# Altium PCB End-Device-v1.0.PcbDoc (part 4 of 4)
Units mil, origin at the board's own origin, x right, y up, seen from the top; angles counter-clockwise.
Board outline 1968.5 x 2440.08 mil, 4 copper layers (Top Layer, Ground, Power, Bottom Layer), stack 61.654 mil thick; 125 components, 76 nets, 388 pads, 715 vias.
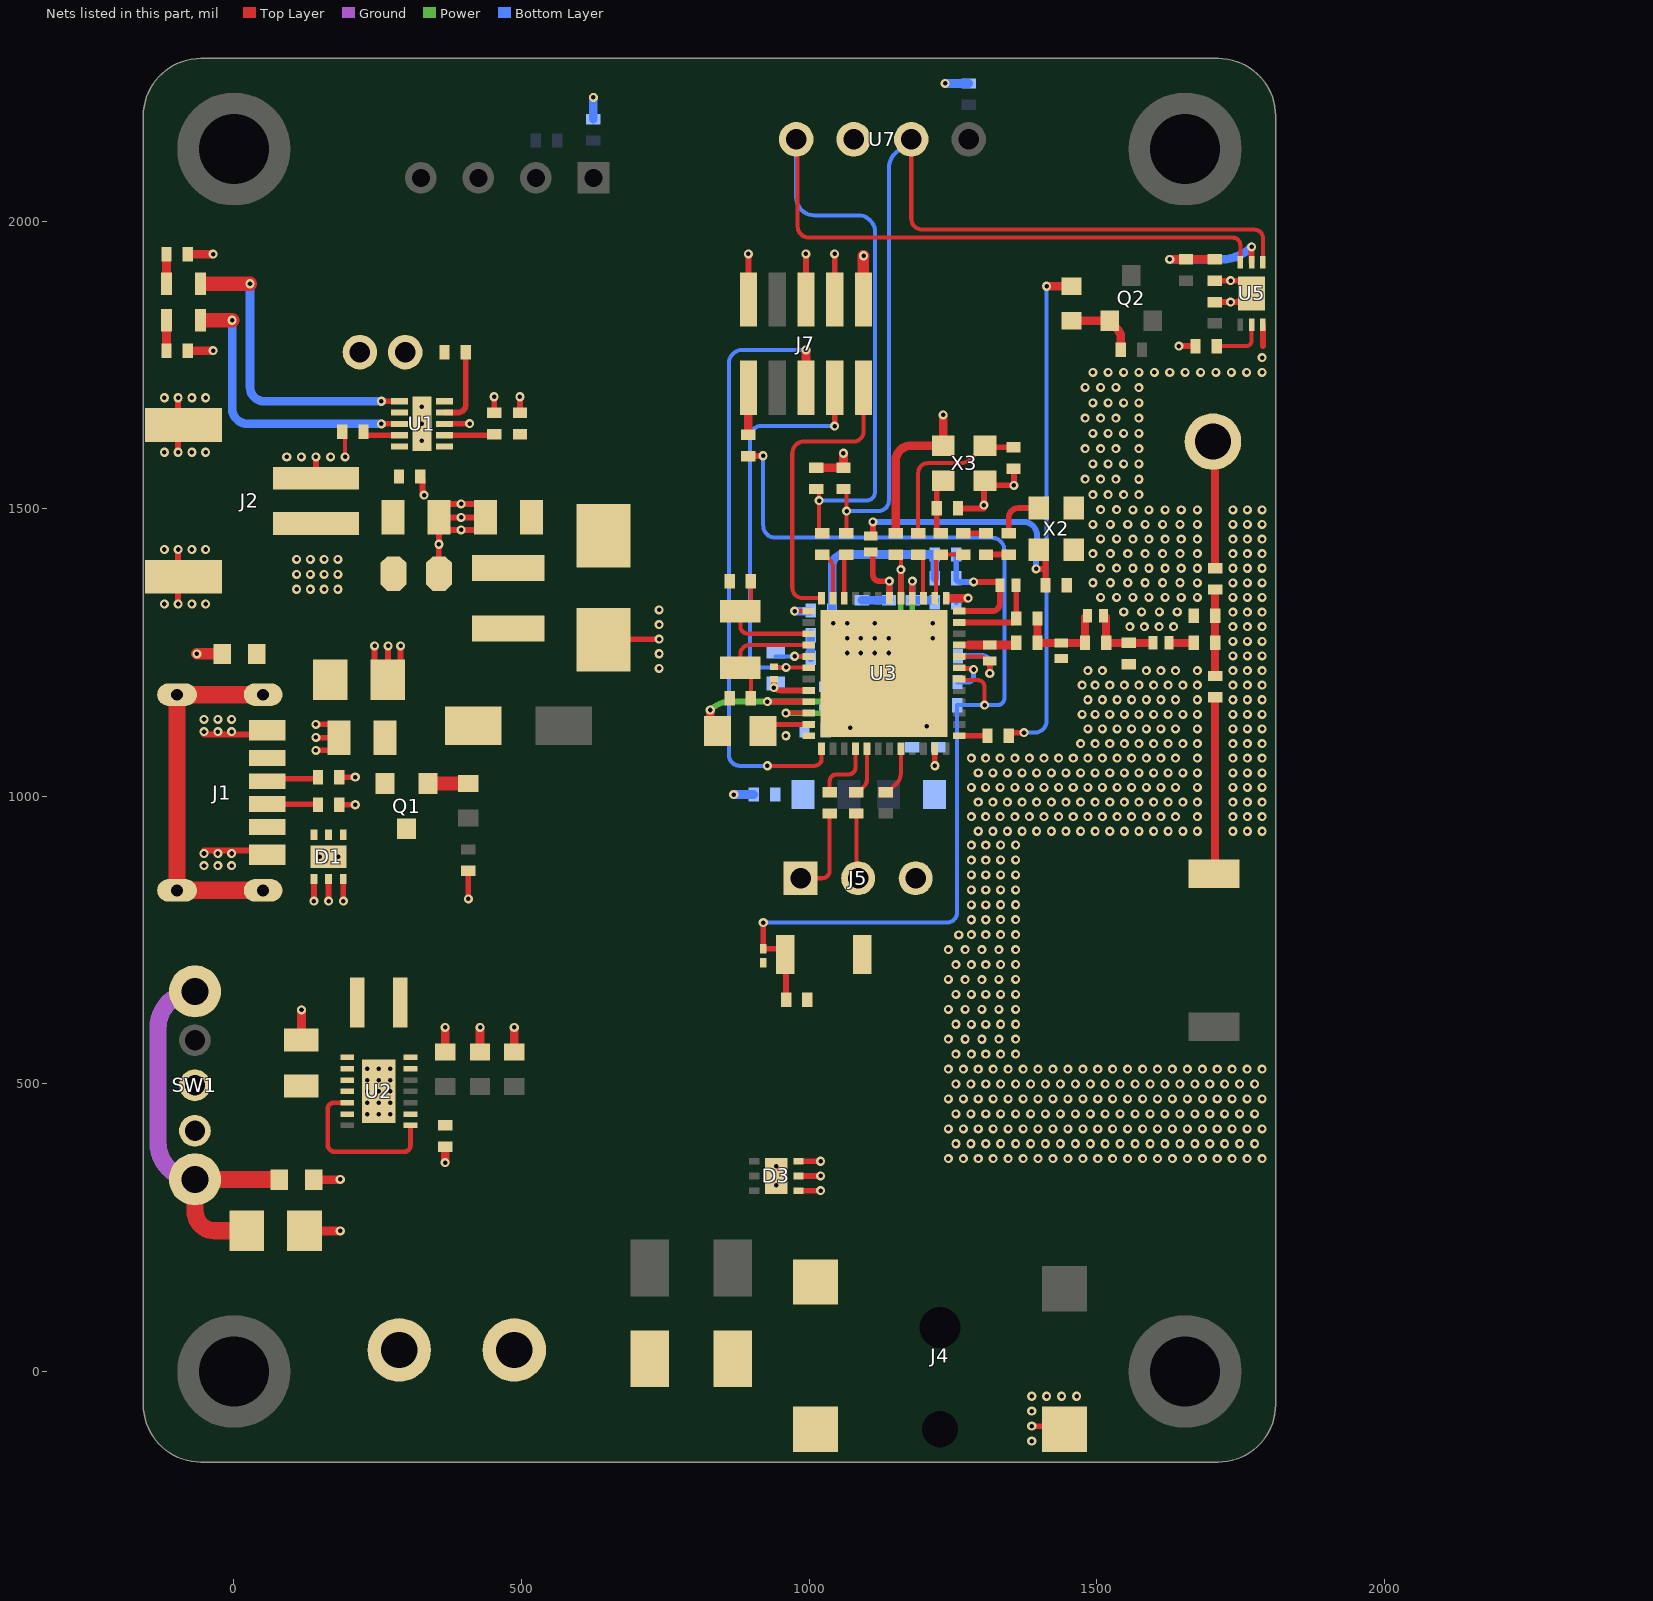
[diagram p4: the nets of this part, all layers, seen from the top]

## Via types
v1: diameter 15.75, hole 7.87, Top Layer to Bottom Layer, tented both sides, 712 vias
v2: diameter 15.75, hole 7.87, Top Layer to Bottom Layer, 3 vias

## Nets (pads, with @x,y where several pads share a name; then routed paths per layer and width w, separated by ;. In a path a pad name is that pad's centre, name@x,y a point inside that pad or via, vN(x,y) a via of type N, cw(c..) or ccw(c..) an arc to the next point about the centre after c; other vN are vias at no path point) (continued)
GND: C1.1 C2.1 C3.1 C4.1 C5.1 C6.1 C7.1 C8.1 C9.1 C10.1 C11.1 C12.1 C16.1 C17.1 C18.1 C19.1 C20.1 C21.1 C22.1 C23.1 C24.1 C25.1 C27.1 C28.1 C29.1 C30.1 C31.1 C35.1 C36.1 C37.1 C38.1 C40.1 C41.1 C42.1 C44.1 C45.1 C46.1 C47.1 C48.1 C49.1 C50.1 D1.1 D1.2 D1.3 D1.7 D2.1 D3.1 D3.2 D3.3 D3.7 D7.2 J1.A12 J1.B12 J2.1 J2.3 J2.4 J3.2 J4.2@1444.06,-100.43 J5.3 J7.3 J7.5 J7.9 NTC1.1 R1.2 R3.2 R6.1 R7.1 R8.1 R9.1 R11.1 R25.2 R41.1 SW4.2 TP1.2 U1.3 U1.11 U2.2 U2.13 U2.15 U3.48 U3.49 U5.3 U5.7 U7.3 X2.1 X2.2 X3.2 X3.4 | length 3809.9
  Top Layer w7: R7.1@188.37,1633.65 193.48,1628.54 v1(193.48,1590.09)
  Top Layer w10: v1(-97,1334.26) -97,1372.26 cw(c-87.63,1372.27) J2.3@-87.63,1381.63 cw(c-87.63,1391) -97,1391 v1(-97,1429) ; v1(-96.97,1598.05) -96.97,1636.05 cw(c-87.6,1636.05) J2.4@-87.63,1645.41 cw(c-87.6,1654.78) -96.97,1654.78 v1(-96.97,1692.78) ; v1@-51.93,905.54 50.59,905.54 cw(c50.59,898.26) J1.A12@57.87,898.26 ; v1@-51.93,1107.51 J1.B12@50.59,1107.51 ; v1(139.09,817.79) D1.1@139.09,856.4 ; v1@142.27,1125.01 C12.1@182.32,1125.01 ; v1@142.63,1079.81 C12.1@182.68,1079.81 ; v1@142.63,1101.65 C12.1@182.68,1101.65 ; J2.1@142.68,1565.07 v1(142.68,1590.09) ; v1(164.68,817.79) D1.2@164.68,856.4 ; R3.2@183.18,985.29 v1(211,985.29) ; R1.2@183.18,1033.21 v1(211,1033.21) ; v1(190.27,817.79) D1.3@190.27,856.4 ; C5.1@244.65,1221.35 v1(244.65,1261.3) v1@244.65,1261.41 ; C5.1@268,1221 v1@268,1261.05 ; C5.1@289.84,1221 v1@289.84,1261.05 ; C2.1@324.02,1555.99 327.91,1552.11 327.91,1528.01 330.8,1525.12 v1(330.8,1523.57) ; C1.1@356.17,1508.19 v1(395.12,1508.19) C3.1@435.06,1508.19 ; TP1.2@356.32,1384.21 TP1.2@356.32,1387.21 356.32,1434.12 356.52,1434.12 v1(356.52,1438.12) C1.1@356.52,1463 ; U1.3@366.07,1647.34 366.32,1647.59 409.38,1647.59 v1(409.63,1647.85) ; v1(407.52,821.79) R11.1@407.52,870.52 ; C3.1@435.42,1463 v1(395.12,1463) C1.1@356.52,1463 ; C3.1@435.42,1484.84 v1(395.12,1484.84) C1.1@356.52,1484.84 C1.1@356.52,1463 ; R8.1@452.41,1666.65 v1(452.41,1694.58) ; C4.1@497.32,1666.65 v1(497.32,1694.58) ; D2.1@642.52,1271.97 cw(c643.73,1271.97) 643.73,1273.17 v1(739.32,1273.17) ; J7.9@894.45,1863.72 v1(894.45,1943) ; D3.1@981.39,314.41 v1(1020,314.41) ; D3.2@981.39,340 v1(1020,340) ; D3.3@981.39,365.59 v1(1020,365.59) ; J7.5@994.45,1863.72 v1(994.45,1943) ; J7.3@1044.45,1863.72 v1(1044.45,1943) ; C44.1@1258.86,1500.38 1303.22,1500.38 ccw(c1303.22,1501.12) 1303.95,1501.12 v1(1303.95,1506.12) 1303.95,1546.79 cw(c1305.78,1546.79) X3.2@1305.78,1548.61 ccw(c1313.77,1548.61) 1313.77,1540.62 v1(1356.05,1540.62) 1356.05,1569.62 C45.1@1355.36,1569.62 ; v1(1387,-95) 1438.63,-95 cw(c1438.63,-100.43) J4.2@1444.06,-100.43 cw(c1444.06,-95.37) J4.2@1439,-95.37 ; v1(1642.66,1782.56) R41.1@1671.66,1782.56 ; C49.1@1705.16,1859.06 v1(1732.59,1859.06) 1754.02,1859.06 ccw(c1754.02,1874.2) U5.7@1769.16,1874.2 ccw(c1747.02,1874.2) 1747.02,1896.33 v1(1732.59,1896.33) C50.1@1705.16,1896.33 ; 1788.84,1782.56 U5.3@1788.84,1820.06
  Top Layer w15: C29.1@1150.48,1457.12 1150.48,1583.03 cw(c1177.09,1583.03) 1177.09,1609.63 X3.4@1232.94,1609.63 v1(1232.94,1662.93)
  Top Layer w15.33: C6.1@117.52,576.4 v1(117.52,628.78) ; C10.1@122.76,244.52 v1(184.91,244.52) ; R9.1@138.76,333.41 184.91,333.41 v1(184.91,334.02) ; v1(367.35,363) C11.1@367.35,390.89 ; C7.1@367.34,555.45 v1(367.34,598.12) ; C9.1@427.97,555.45 v1(427.97,598.12) ; C8.1@487.35,555.45 v1(487.35,598.12)
  Top Layer w20: v1(-64.37,1247.52) R6.1@-20.22,1247.52
  Bottom Layer w10: C25.1@1039.87,1241.15 1042.59,1243.87 1042.59,1277.45 C24.1@1039.87,1280.16 1042.09,1282.37 v1(1042.09,1301.05) v1@1040.99,1302.15 ; C23.1@1039.87,1322.89 C23.1@1040.99,1321.78 ; v1@1041.99,1302.15 C23.1@1041.99,1321.78 ; C42.1@1091.8,1301.05 v1(1114.09,1301.05) v1(1215.09,1301.05) ; 1191.09,1249.05 1215.95,1249.05 cw(c1215.95,1243.15) C46.1@1221.86,1243.15
  Bottom Layer w15: C47.1@625,2177 v2(625,2215) ; C27.1@903.91,1003.1 903.86,1003.05 v1@869.05,1003.05 ; C28.1@1029,1114.46 1029,1152.66 cw(c1029.96,1152.66) C16.1@1029.96,1153.61 C17.1@1071.03,1153.61 1071.09,1153.61 v1(1071.09,1119.05) ; C23.1@1039.87,1322.89 1039.87,1400.79 cw(c1059.37,1400.79) 1059.37,1420.29 C31.1@1218.54,1420.29 C30.1@1218.54,1379.07 ; C22.1@1179.26,1121.96 C18.1@1224.54,1121.96 ; v2(1236.51,2239.34) 1236.51,2239 C48.1@1277.5,2239 ; v1(869,1003) v1@869.05,1003.05
  other v1: 1387,-121 1387,-69 1387,-43 1413,-43 1439,-43 1465,-43 943,324.2 943,356.8 1242.07,370 1268.03,370 1294,370 1319.97,370 1345.93,370 1371.9,370 1397.86,370 1423.83,370 1449.8,370 1475.76,370 1501.73,370 1527.69,370 1553.66,370 1579.62,370 1605.59,370 1631.56,370 1657.52,370 1683.49,370 1709.45,370 1735.42,370 1761.39,370 1787.35,370 1255.05,395.97 1281.02,395.97 1306.98,395.97 1332.95,395.97 1358.91,395.97 1384.88,395.97 1410.85,395.97 1436.81,395.97 1462.78,395.97 1488.74,395.97 1514.71,395.97 1540.68,395.97 1566.64,395.97 1592.61,395.97 1618.57,395.97 1644.54,395.97 1670.51,395.97 1696.47,395.97 1722.44,395.97 1748.4,395.97 1774.37,395.97 1242.07,421.94 1268.03,421.94 1294,421.94 1319.97,421.94 1345.93,421.94 1371.9,421.94 1397.86,421.94 1423.83,421.94 1449.8,421.94 1475.76,421.94 1501.73,421.94 1527.69,421.94 1553.66,421.94 1579.62,421.94 1605.59,421.94 1631.56,421.94 1657.52,421.94 1683.49,421.94 1709.45,421.94 1735.42,421.94 1761.39,421.94 1787.35,421.94 1255.05,447.9 1281.02,447.9 1306.98,447.9 1332.95,447.9 1358.91,447.9 1384.88,447.9 1410.85,447.9 1436.81,447.9 1462.78,447.9 1488.74,447.9 1514.71,447.9 1540.68,447.9 1566.64,447.9 1592.61,447.9 1618.57,447.9 1644.54,447.9 1670.51,447.9 1696.47,447.9 1722.44,447.9 1748.4,447.9 1774.37,447.9 1242.07,473.87 1268.03,473.87 1294,473.87 1319.97,473.87 1345.93,473.87 1371.9,473.87 1397.86,473.87 1423.83,473.87 1449.8,473.87 1475.76,473.87 1501.73,473.87 1527.69,473.87 1553.66,473.87 1579.62,473.87 1605.59,473.87 1631.56,473.87 1657.52,473.87 1683.49,473.87 1709.45,473.87 1735.42,473.87 1761.39,473.87 1787.35,473.87 1255.05,499.83 1281.02,499.83 1306.98,499.83 1332.95,499.83 1358.91,499.83 1384.88,499.83 1410.85,499.83 1436.81,499.83 1462.78,499.83 1488.74,499.83 1514.71,499.83 1540.68,499.83 1566.64,499.83 1592.61,499.83 1618.57,499.83 1644.54,499.83 1670.51,499.83 1696.47,499.83 1722.44,499.83 1748.4,499.83 1774.37,499.83 1242.07,525.8 1268.03,525.8 1294,525.8 1319.97,525.8 1345.93,525.8 1371.9,525.8 1397.86,525.8 1423.83,525.8 1449.8,525.8 1475.76,525.8 1501.73,525.8 1527.69,525.8 1553.66,525.8 1579.62,525.8 1605.59,525.8 1631.56,525.8 1657.52,525.8 1683.49,525.8 1709.45,525.8 1735.42,525.8 1761.39,525.8 1787.35,525.8 1255.05,551.77 1282,551.64 1307.01,551.64 1332.92,551.77 1358.89,551.77 1242.07,577.73 1271.27,577.6 1300.48,577.6 1329.68,577.73 1358.89,577.73 1255.05,603.7 1282,603.57 1307.01,603.57 1332.92,603.7 1358.89,603.7 1242.07,629.66 1271.27,629.54 1300.48,629.54 1329.68,629.66 1358.89,629.66 1255.05,655.63 1282,655.5 1307.01,655.5 1332.92,655.63 1358.89,655.63 1271.27,681.47 1300.48,681.47 1242.07,681.6 1329.68,681.6 1358.89,681.6 1255.05,707.31 1282,707.43 1307.01,707.43 1332.92,707.56 1358.89,707.56 1271.27,733.4 1300.48,733.4 1242.07,733.53 1329.68,733.53 1358.89,733.53 1260.05,758.98 1282,759.36 1307.01,759.36 1332.92,759.49 1358.89,759.49 1282,785.33 1307.01,785.33 1332.92,785.46 1358.89,785.46 1282,811.3 1307.01,811.3 1332.92,811.42 1358.89,811.42 1282,837.26 1307.01,837.26 1332.92,837.39 1358.89,837.39 1282,863.23 1307.01,863.23 1332.92,863.36 1358.89,863.36 -51.93,879.54 -27.93,879.54 -3.93,879.54 1282,889.19 1307.01,889.19 1332.92,889.32 1358.89,889.32 148.88,894.79 181.47,894.79 -51.93,900.54 -27.93,900.54 -3.93,900.54 1282,915.16 1307.01,915.16 1332.92,915.29 1358.89,915.29 1294,939.2 1319.4,939.2 1344.8,939.2 1370.2,939.2 1395.6,939.2 1421,939.2 1446.4,939.2 1471.8,939.2 1497.2,939.2 1522.6,939.2 1548,939.2 1573.4,939.2 1598.8,939.2 1624.2,939.2 1649.6,939.2 1675,939.2 1736.55,939.2 1761.95,939.2 1787.35,939.2 1282,964.6 1306.7,964.6 1332.1,964.6 1357.5,964.6 1382.9,964.6 1408.3,964.6 1433.7,964.6 1459.1,964.6 1484.5,964.6 1509.9,964.6 1535.3,964.6 1560.7,964.6 1586.1,964.6 1611.5,964.6 1636.9,964.6 1675,964.6 1736.55,964.6 1761.95,964.6 1787.35,964.6 1294,990 1319.4,990 1344.8,990 1370.2,990 1395.6,990 1421,990 1446.4,990 1471.8,990 1497.2,990 1522.6,990 1548,990 1573.4,990 1598.8,990 1624.2,990 1649.6,990 1675,990 1736.55,990 1761.95,990 1787.35,990 1282,1015.4 1306.7,1015.4 1332.1,1015.4 1357.5,1015.4 1382.9,1015.4 1408.3,1015.4 1433.7,1015.4 1459.1,1015.4 1484.5,1015.4 1509.9,1015.4 1535.3,1015.4 1560.7,1015.4 1586.1,1015.4 1611.5,1015.4 1636.9,1015.4 1675,1015.4 1736.55,1015.4 1761.95,1015.4 1787.35,1015.4 1294,1040.8 1319.4,1040.8 1344.8,1040.8 1370.2,1040.8 1395.6,1040.8 1421,1040.8 1446.4,1040.8 1471.8,1040.8 1497.2,1040.8 1522.6,1040.8 1548,1040.8 1573.4,1040.8 1598.8,1040.8 1624.2,1040.8 1649.6,1040.8 1675,1040.8 1736.55,1040.8 1761.95,1040.8 1787.35,1040.8 1282,1066.2 1306.7,1066.2 1332.1,1066.2 1357.5,1066.2 1382.9,1066.2 1408.3,1066.2 1433.7,1066.2 1459.1,1066.2 1484.5,1066.2 1509.9,1066.2 1535.3,1066.2 1560.7,1066.2 1586.1,1066.2 1611.5,1066.2 1636.9,1066.2 1675,1066.2 1736.55,1066.2 1761.95,1066.2 1787.35,1066.2 142.37,1079.81 1471.8,1091.6 1497.2,1091.6 1522.6,1091.6 1548,1091.6 1573.4,1091.6 1598.8,1091.6 1624.2,1091.6 1649.6,1091.6 1675,1091.6 1736.55,1091.6 1761.95,1091.6 1787.35,1091.6 142.37,1102.41 959.7,1105.26 -51.93,1112.51 -27.93,1112.51 -3.93,1112.51 1484.5,1117 1509.9,1117 1535.3,1117 1560.7,1117 1586.1,1117 1611.5,1117 1636.9,1117 1675,1117 1736.55,1117 1761.95,1117 1787.35,1117 1204.72,1122.01 142.37,1125.01 -51.93,1133.51 -27.93,1133.51 -3.93,1133.51 1474.53,1142.4 1497.2,1142.4 1522.6,1142.4 1548,1142.4 1573.4,1142.4 1598.8,1142.4 1624.2,1142.4 1649.6,1142.4 1675,1142.4 1736.55,1142.4 1761.95,1142.4 1787.35,1142.4 1484.5,1167.8 1509.9,1167.8 1535.3,1167.8 1560.7,1167.8 1586.1,1167.8 1611.5,1167.8 1636.9,1167.8 1675,1167.8 1736.55,1167.8 1761.95,1167.8 1787.35,1167.8 1474.53,1193.2 1497.2,1193.2 1522.6,1193.2 1548,1193.2 1573.4,1193.2 1598.8,1193.2 1624.2,1193.2 1649.6,1193.2 1675,1193.2 1736.55,1193.2 1761.95,1193.2 1787.35,1193.2 1484.5,1218.6 1509.9,1218.6 1586.1,1218.6 1611.5,1218.6 1636.9,1218.6 1675,1218.6 1736.55,1218.6 1761.95,1218.6 1787.35,1218.6 739.32,1222.37 1736.55,1244 1761.95,1244 1787.35,1244 739.32,1247.77 1066.09,1249.05 1090.09,1249.05 1114.09,1249.05 1138.09,1249.05 268,1261.3 289.84,1261.3 1736.55,1269.4 1761.95,1269.4 1787.35,1269.4 1066.09,1275.05 1090.09,1275.05 1114.09,1275.05 1138.09,1275.05 1215.09,1275.05 1557.56,1294.8 1582.96,1294.8 1608.36,1294.8 1633.76,1294.8 1736.55,1294.8 1761.95,1294.8 1787.35,1294.8 739.32,1298.57 1066.09,1301.05 1546.88,1320.38 1577.88,1320.38 1608.88,1320.38 1639.88,1320.38 1736.55,1320.2 1761.95,1320.2 1787.35,1320.2 739.32,1323.97 -121,1334.26 -73,1334.26 -49,1334.26 1506.54,1345.78 1534.62,1345.78 1562.69,1345.6 1590.77,1345.6 1618.85,1345.6 1646.92,1345.6 1675,1345.6 1736.55,1345.6 1761.95,1345.6 1787.35,1345.6 1493.4,1371.18 1523.66,1371.18 1553.93,1371.18 1584.2,1371.18 1614.47,1371.18 1644.73,1371.18 1675,1371 1736.55,1371 1761.95,1371 1787.35,1371 1562.69,1396.4 1590.77,1396.4 1618.85,1396.4 1646.92,1396.4 1675,1396.4 1736.55,1396.4 1761.95,1396.4 1787.35,1396.4 1506.54,1396.58 1534.62,1396.58 1493.4,1421.98 1523.66,1421.98 1553.93,1421.98 1584.2,1421.98 1614.47,1421.98 1644.73,1421.98 1675,1421.8 1736.55,1421.8 1761.95,1421.8 1787.35,1421.8 -121,1429 -73,1429 -49,1429 1506.54,1447.38 1534.62,1447.38 1562.69,1447.2 1590.77,1447.2 1618.85,1447.2 1646.92,1447.2 1675,1447.2 1736.55,1447.2 1761.95,1447.2 1787.35,1447.2 1493.4,1472.78 1523.66,1472.78 1553.93,1472.78 1584.2,1472.78 1614.47,1472.78 1644.73,1472.78 1675,1472.6 1736.55,1472.6 1761.95,1472.6 1787.35,1472.6 1506.54,1498.18 1534.62,1498.18 1562.69,1498 1590.77,1498 1618.85,1498 1646.92,1498 1675,1498 1736.55,1498 1761.95,1498 1787.35,1498 1493.17,1524.56 1519.91,1524.56 1546.66,1524.56 1573.4,1524.56 1479.8,1551.3 1506.54,1551.3 1533.28,1551.3 1573.4,1551.12 1493.17,1577.68 1519.91,1577.68 1546.66,1577.68 1573.4,1577.68 91.88,1590.09 117.28,1590.09 168.08,1590.09 -120.97,1598.05 -72.97,1598.05 -48.97,1598.05 1479.8,1604.43 1506.54,1604.43 1533.28,1604.43 1573.4,1604.24 326.89,1617.65 1493.17,1630.8 1519.91,1630.8 1546.66,1630.8 1573.4,1630.8 326.89,1647.34 1573.4,1657.36 1479.8,1657.55 1506.54,1657.55 1533.28,1657.55 326.89,1677.02 1493.17,1683.92 1519.91,1683.92 1546.66,1683.92 1573.4,1683.92 -120.97,1692.78 -72.97,1692.78 -48.97,1692.78 1479.8,1710.67 1506.54,1710.67 1533.28,1710.67 1573.4,1710.48 1493.17,1737.05 1519.91,1737.05 1546.66,1737.05 1573.4,1737.05 1600.14,1737.05 1626.89,1737.05 1653.63,1737.05 1680.38,1737.05 1707.12,1737.05 1733.86,1737.05 1760.61,1737.05 1787.35,1737.05 1787.35,1762.56
I2C2_SCL: R19.1 R33.1 U5.6 U7.4 | length 1881.8
  Top Layer w7: U7.4@977.5,2142 cw(c977.5,2139.5) 980,2139.5 980,1990.81 ccw(c999.37,1990.81) 999.37,1971.44 1191.03,1971 1738,1971 cw(c1738,1964) 1739.7,1970.79 cw(c1736.52,1958.23) 1749.47,1958.23 U5.6@1749.47,1928.33 ; R33.1@1017.2,1535.68 1017.2,1462.6 ccw(c1022.69,1462.6) R19.1@1022.69,1457.12
  Bottom Layer w7: U7.4@977.5,2142 977.5,2041.61 ccw(c1009.11,2041.61) 1009.11,2010 1085,2010 cw(c1085,1980.31) 1114.69,1980.31 1114.69,1529.32 cw(c1099.37,1529.32) 1099.37,1514 v1(1017.31,1514)
I2C2_SDA: R18.1 R32.1 U5.4 U7.2 | length 1621.8
  Top Layer w7: R32.1@1059.67,1534.12 1065,1528.79 v1(1065,1495.63) 1065,1457.45 R18.1@1064.67,1457.12 ; U7.2@1177.5,2142 1177.5,2004.33 ccw(c1196.83,2004.33) 1196.83,1985 1774.08,1985 cw(c1774.08,1970.24) 1788.84,1970.24 U5.4@1788.84,1928.33
  Bottom Layer w7: v1@1065,1496 1120.67,1496 ccw(c1120.67,1513.77) 1138.44,1513.77 1138.44,2090.55 cw(c1177.5,2090.55) 1173.75,2129.43 1177.5,2133.17 U7.2@1177.5,2142
NetANT1_1: ANT1.1 R30.2 | length 308.3
  Top Layer w10: ANT1.1@1703.92,865.54 ANT1.1@1705.71,865.54
  Top Layer w13.98: ANT1.1@1705.71,865.54 R30.2@1705.71,1172.02
NetANT2_1: ANT2.1 R35.2 | length 223.7
  Top Layer w13.98: ANT2.1@1701.96,1616.52 1705.71,1616.52 R35.2@1705.71,1396.52
NetC3_2: C3.2 C4.2 D2.2 F1.2 U1.1
NetC5_2: C5.2 J1.MH1 J1.MH2 J1.MH3 J1.MH4 R6.2 | length 639.4
  Top Layer w30: J1.MH1@50.78,836.44 J1.MH2@-98.82,836.44 J1.MH3@-98.82,1176.6 J1.MH4@50.78,1176.6
NetC10_2: C10.2 R9.2 SW1.4 SW1.5 | length 712.5
  Top Layer w30: C10.2@22.76,244.52 -32.69,244.52 cw(c-32.69,279.52) -67.69,279.52 SW1.5@-67.69,334.02 77.15,334.02 cw(c77.15,332.41) R9.2@78.76,332.41
  Ground w30: SW1.5@-67.69,334.02 cw(c-67.69,398.33) -132,398.33 -132,596.48 cw(c-67.69,596.48) SW1.4@-67.69,660.79
NetC11_2: C11.2 U2.1 U2.12 | length 293.8
  Top Layer w8: U2.12@196.72,467.26 173.95,467.26 ccw(c173.95,456.31) 163,456.31 163,395.08 ccw(c176.2,395.08) 176.2,381.89 295.65,381.89 ccw(c295.65,393.19) 306.96,393.19 U2.1@306.96,427.89
NetC19_2: C19.2 U3.39 X1.2 | length 214.5
  Top Layer w7: C19.2@898.8,1373.62 898.8,1340.39 cw(c880.3,1340.39) X1.2@880.3,1321.89 880.3,1296.3 ccw(c894.08,1296.3) 894.08,1282.52 U3.39@999.05,1282.52
NetC20_2: C20.2 U3.40 X1.1 | length 215.1
  Top Layer w7: C20.2@898.8,1170.31 898.8,1204.96 ccw(c880.3,1204.96) X1.1@880.3,1223.46 880.3,1247.09 cw(c896.05,1247.09) 896.05,1262.83 U3.40@999.05,1262.83
NetC24_2: C24.2 C25.2 FB1.2 U3.41 | length 126.6
  Top Layer w7: v1(974.7,1243.44) 974.7,1243.15 U3.41@999.05,1243.15
  Bottom Layer w7: FB1.2@941.95,1243.18 C25.2@1002.87,1243.18
  Bottom Layer w15: C25.2@1002.87,1241.15 C24.2@1002.87,1282.16
NetC30_2: C30.2 C31.2 L3.2 U3.24 | length 230.9
  Top Layer w10: U3.24@1260.86,1321.89 1318.14,1321.89 ccw(c1318.14,1335.49) 1331.74,1335.49 L3.2@1331.74,1366.7 ; v1(1286,1372.7) L3.2@1331.74,1372.7
  Bottom Layer w10: C31.2@1255.54,1420.29 C30.2@1255.54,1379.07 ccw(c1261.91,1379.07) 1261.91,1372.7 v1(1286,1372.7)
NetC32_1: C32.1 C33.2 C36.2 C39.2 L4.1 | length 174.8
  Top Layer w13.98: C33.2@1397,1309.11 C39.2@1397,1266.77 C36.2@1438.55,1266.77 C32.1@1479.47,1266.77 1479.47,1309.38 cw(c1484.2,1309.38) L4.1@1484.2,1314.11
NetC32_2: C32.2 C37.2 L4.2 L5.1 | length 131.2
  Top Layer w13.98: L4.2@1511.75,1314.11 cw(c1511.75,1309.4) 1516.47,1309.4 C32.2@1516.47,1266.77 C37.2@1555.52,1266.77 L5.1@1597.67,1266.77
NetC33_1: C33.1 L3.1 U3.23 | length 160.6
  Top Layer w10: U3.23@1260.86,1302.2 1356,1302.2 1360,1306.2 L3.1@1360,1366.01
NetC34_1: C34.1 L5.2 | length 41.5
  Top Layer w13.98: L5.2@1625.23,1266.77 C34.1@1666.71,1266.77
NetC34_2: C34.2 C38.2 R30.1 R35.1 | length 150.5
  Top Layer w13.98: R30.1@1705.71,1209.02 C34.2@1705.71,1266.77 C38.2@1705.71,1314.11 R35.1@1705.71,1359.52
NetC35_2: C35.2 FB2.1 X2.4 | length 466.5
  Top Layer w10: FB2.1@1110.8,1452.39 1111,1452.6 v1(1111,1477) ; v1(1394.44,1395.27) 1410.97,1395.27 ; X2.4@1398.95,1428.29 cw(c1398.95,1416.28) 1410.97,1416.28 1410.97,1395.27 ; C35.2@1410.97,1366.7 1410.97,1395.27
  Bottom Layer w10: v1(1111,1477) 1372.57,1477 cw(c1372.57,1453.37) 1396.17,1452.27 1396.15,1451.81 v1(1394.44,1395.27)
NetC39_1: C39.1 L6.2 U3.21 | length 85.5
  Top Layer w15: 1277.37,1263.01 1358.5,1263.01 1360,1264.51 C39.1@1360,1266.77
NetC43_1: C43.1 R36.2 | length 43
  Top Layer w10: C43.1@1303.95,1420.12 R36.2@1346.91,1420.12
NetC43_2: C43.2 R37.1 | length 43.1
  Top Layer w10: R37.1@1260.86,1457.12 C43.2@1303.95,1457.12
NetC44_2: C44.2 R38.1 X3.1 | length 92.4
  Top Layer w10: X3.1@1221.86,1548.61 C44.2@1221.86,1500.38 1221.86,1458.8 ccw(c1223.54,1458.8) R38.1@1223.54,1457.12
NetC45_2: C45.2 R39.1 X3.3 | length 292.5
  Top Layer w7: R39.1@1189.59,1457.11 1189.59,1562.12 cw(c1206.59,1562.12) 1206.59,1579.12 1261.8,1579.12 ccw(c1261.8,1609.63) 1285.41,1590.31 1289.59,1595.42 X3.3@1305.78,1609.63
  Top Layer w10: X3.3@1305.78,1609.63 ccw(c1313.05,1616.9) 1313.05,1606.62 C45.2@1355.36,1606.62
NetC46_2: C46.2 L6.1 U3.20 | length 157.3
  Top Layer w7: U3.20@1260.86,1243.15 1294.78,1243.15 cw(c1294.78,1216.27) L6.1@1313.79,1235.28 ; v1@1313.79,1213.75 v1(1313.99,1213.55)
  Top Layer w10: v1@1313.79,1213.75 L6.1@1313.79,1235.28
  Bottom Layer w7: C46.2@1258.86,1243.15 cw(c1259.83,1243.15) C46.2@1259.83,1244.12
  Bottom Layer w10: C46.2@1259.83,1244.12 1300.32,1244.12 cw(c1300.32,1230.65) 1313.79,1230.65 1313.79,1213.55 v1(1313.99,1213.55)
NetC50_2: C50.2 R40.1 U5.5 | length 253
  Top Layer w10: U5.5@1769.16,1928.33 v1(1769.16,1955)
  Top Layer w15: v1(1626.89,1933.33) R40.1@1655.16,1933.33 C50.2@1705.16,1933.33
  Bottom Layer w15: v1(1626.89,1933.33) 1716.84,1933.33 ccw(c1716.84,2007.32) v1(1769.16,1955)
NetD4_2: D4.2 J3.1
NetD5_2: D5.2 J4.1
NetJ1_A5: J1.A5 R1.1 | length 91.2
  Top Layer w10: J1.A5@57.87,1026.21 62.29,1030.62 143.59,1030.62 R1.1@146.18,1033.21
NetJ1_B5: J1.B5 R3.1 | length 88
  Top Layer w10: J1.B5@58.53,986.18 145.29,986.18 R3.1@146.18,985.29
NetL1_1: L1.1 U2.8 U2.9
NetL1_2: L1.2 U2.6 U2.7
NetL2_2: L2.2 U3.47 | length 84.2
  Top Layer w9: L2.2@930.92,1124.66 U3.47@998.67,1124.66
  Top Layer w10: L2.2@919.67,1113.41 L2.2@930.92,1124.66 ; U3.47@998.67,1124.66 U3.47@999.05,1125.04
NetLED1_1: LED1.1 R2.1 | length 52.9
  Top Layer w15: R2.1@-117.16,1774.63 LED1.1@-117.16,1827.52
NetLED1_2: LED1.2 U1.8 | length 510.5
  Top Layer w10: v1(256.52,1647.53) 278.15,1647.53 U1.8@287.72,1647.34
  Top Layer w25: LED1.2@-54.28,1827.52 v1(-3,1827.52)
  Bottom Layer w15: v1(-3,1827.52) -3,1674.29 ccw(c23.77,1674.29) 23.77,1647.53 v1(256.52,1647.53)
NetLED2_1: LED2.1 R4.1 | length 51.8
  Top Layer w15: LED2.1@-117.16,1890.76 R4.1@-117.16,1942.52
NetNTC1_2: NTC1.2 R5.1 U1.5
NetQ1_1: Q1.1 R10.2 | length 70
  Top Layer w25: Q1.1@337.48,1022.2 R10.2@407.52,1022.2
NetQ2_1: Q2.1 R43.2 R44.2 | length 123.8
  Top Layer w15: R44.2@1456.16,1826.68 Q2.1@1522.76,1826.68 1535.4,1812.39 cw(c1522.76,1798.34) 1541.66,1798.34 R43.2@1541.66,1776.09
NetR5_2: R5.2 U1.4 | length 136
  Top Layer w10: U1.4@366.07,1667.02 389.18,1667.02 ccw(c389.18,1680.91) 403.07,1680.91 R5.2@403.07,1772.02
NetR7_2: R7.2 U1.9 | length 65.8
  Top Layer w10: R7.2@225.37,1633.65 ccw(c231.37,1633.65) 231.37,1627.65 U1.9@287.72,1627.65
NetR8_2: R8.2 U1.2 | length 88.6
  Top Layer w10: U1.2@366.07,1627.65 448.41,1627.65 ccw(c448.41,1631.65) R8.2@452.41,1631.65
NetR12_2: R12.2 U3.8 | length 86.8
  Top Layer w7: R12.2@1133.15,1007.12 1142.15,1012.62 1151.35,1021.43 ccw(c1133.15,1040.46) 1159.48,1040.46 U3.8@1159.48,1082.72
NetR15_2: R15.2 U3.13 | length 49.2
  Top Layer w10: U3.13@1260.86,1105.35 R15.2@1310.02,1105.35
NetR16_1: R16.1 U3.4 | length 110.5
  Top Layer w7: R16.1@1035.74,1007.12 1035.74,1026.75 cw(c1046.81,1026.75) 1046.81,1037.81 1068.37,1037.81 ccw(c1068.37,1050.19) 1080.74,1050.19 U3.4@1080.74,1082.72
NetR17_1: R17.1 U3.5 | length 83.9
  Top Layer w7: R17.1@1081.94,1007.12 1090.94,1012.62 1094.02,1015.28 ccw(c1081.94,1029.27) 1100.43,1029.27 U3.5@1100.43,1082.72
NetR18_2: R18.2 U3.34 | length 77.7
  Top Layer w7: U3.34@1061.06,1344.53 1061.06,1416.51 cw(c1064.67,1416.51) R18.2@1064.67,1420.12
NetR19_2: R19.2 U3.35 | length 84.2
  Top Layer w7: R19.2@1022.69,1420.12 1031.69,1414.62 1033.27,1413.53 cw(c1022.69,1398.13) 1041.37,1398.13 U3.35@1041.37,1344.53
NetR24_1: R24.1 U3.19 | length 71.1
  Top Layer w9: U3.19@1260.86,1223.46 1261.95,1222.37 v1@1286,1222.37
  Bottom Layer w9: R24.1@1257.86,1198.57 1275.74,1198.57 ccw(c1275.74,1208.83) 1286,1208.83 v1(1286,1220.37)
NetR24_2: R24.2 R25.1 | length 38.5
  Bottom Layer w10: R25.1@1182.36,1198.57 R24.2@1220.86,1198.57
NetR36_1: R36.1 X2.3 | length 88.7
  Top Layer w10: R36.1@1346.91,1457.12 1346.91,1484.02 cw(c1364.01,1484.02) 1351.92,1496.11 cw(c1364.01,1484.02) 1364.01,1501.12 X2.3@1398.95,1501.12
NetR37_2: R37.2 R38.2 U3.26 | length 120.6
  Top Layer w7: U3.26@1218.54,1344.53 1220.4,1346.4 1220.4,1414.62 1225.9,1420.12 R38.2@1228.54,1420.12 R37.2@1267.86,1420.12
NetR39_2: R39.2 U3.27 | length 81.1
  Top Layer w7: R39.2@1189.59,1420.11 1192.41,1420.11 1197.91,1414.61 1197.91,1345.47 U3.27@1198.85,1344.53
NetR41_2: R41.2 U5.2 | length 93.8
  Top Layer w7: R41.2@1708.66,1782.56 1759.43,1782.56 ccw(c1759.43,1792.29) 1769.16,1792.29 U5.2@1769.16,1820.06
NRST: C21.2 D7.1 R29.2 R45.1 SW4.1 U3.18 | length 1896.6
  Top Layer w7: U3.18@1260.86,1203.78 U3.18@1260.94,1203.86 ; U3.18@1260.94,1201.86 1293.42,1201.86 cw(c1293.42,1190.36) 1304.92,1190.36 v1(1304.92,1158.5)
  Top Layer w10: R29.2@894.45,1591.4 920,1591.4 v1(920,1592) ; v1(920.28,780.44) D7.1@920.28,734.98 948.35,734.98 cw(c948.35,724.98) SW4.1@958.35,724.98 cw(c958.35,723.33) 960,723.33 C21.2@960,646
  Bottom Layer w7: v1(920,1592) 920,1471.14 ccw(c941.51,1471.14) 941.51,1449.62 1317.38,1449.62 cw(c1317.38,1427.57) 1339.44,1427.57 1339.44,1170.63 cw(c1327.31,1170.63) 1327.31,1158.5 1313.99,1158.5 R45.1@1257.19,1158.5 1257.19,797.85 cw(c1239.78,797.85) 1239.78,780.44 v1(920.28,780.44)
PB0-VDD_TCXO: C41.2 C42.2 FB2.2 U3.30 | length 185.5
  Top Layer w10: FB2.2@1110.8,1424.83 1110.8,1385.2 ccw(c1122,1385.2) 1122,1374 v1(1139.61,1374) 1139.61,1344.53 U3.30@1139.8,1344.53
  Bottom Layer w10: C41.2@1138.8,1340.53 1139.8,1341.53 1139.8,1373.81 v1(1139.61,1374)
  Bottom Layer w15: C42.2@1091.8,1340.53 C41.2@1138.8,1340.53
PG: LED2.2 U1.6 U1.7 | length 537
  Top Layer w10: v1(256.52,1686.71) U1.6@287.72,1686.71
  Top Layer w25: LED2.2@-55.45,1890.76 27.76,1890.76 v1(28,1891)
  Bottom Layer w15: v1(28,1891) 28,1711.36 ccw(c52.65,1711.36) 52.65,1686.71 v1(256.52,1686.71)
PWR_SW: R15.1 R44.1 | length 876.2
  Top Layer w10: R15.1@1347.02,1110.35 v1@1373.54,1110.35
  Top Layer w15: v1(1412.82,1886.67) R44.1@1456.16,1886.68
  Bottom Layer w7: v1@1373.54,1111 1392.86,1111 ccw(c1392.86,1130.96) 1412.82,1130.96 v1(1412.82,1886.67)
  other v1: 1373.54,1110.55
RST: J7.10 R29.1 | length 81.8
  Top Layer w15: R29.1@894.45,1628.4 J7.10@894.45,1710.18
SWDCLK: J7.4 R31.1 U3.42 | length 742.3
  Top Layer w7: R31.1@939,1223.64 U3.42@998.87,1223.64
  Top Layer w10: v1(1044.45,1643.62) J7.4@1044.45,1710.18
  Bottom Layer w7: v1(959.95,1223.9) 910.84,1223.9 cw(c910.84,1237.87) 896.87,1237.87 896.87,1623.66 cw(c916.82,1623.66) 916.82,1643.62 v1(1044.45,1643.62)
SWDIO: J7.2 U3.36 | length 516.6
  Top Layer w7: U3.36@1021.69,1344.53 988.96,1344.53 cw(c988.96,1362.84) 970.65,1362.84 970.65,1596.06 cw(c991.46,1596.06) 991.46,1616.86 1077.96,1616.86 ccw(c1077.96,1633.36) 1094.45,1633.36 J7.2@1094.45,1710.18
SWO: J7.6 U3.1 | length 1090
  Top Layer w7: v1(927.41,1053.04) 1009.43,1053.04 ccw(c1009.43,1065.3) 1021.69,1065.3 U3.1@1021.69,1082.72
  Top Layer w15: J7.6@994.45,1710.18 v1(994.45,1776)
  Bottom Layer w7: v1(927.41,1053.04) 879.22,1053.04 cw(c879.22,1071.53) 860.74,1071.53 860.74,1752.8 cw(c883.93,1752.8) 883.93,1776 v1(994.45,1776)
UART_RX: J5.2 R17.2 | length 114.5
  Top Layer w7: R17.2@1081.94,970.12 1081.94,860.78 ccw(c1085.2,860.78) J5.2@1085.2,857.52
UART_TX: J5.1 R16.2 | length 157.4
  Top Layer w7: J5.1@985.2,857.52 1022.26,857.52 ccw(c1022.26,871.01) 1035.74,871.01 R16.2@1035.74,970.12
VBAT: C1.2 C2.2 J2.2 R2.2 R4.2 SW1.3 TP1.1 U1.10 | length 88.3
  Top Layer w15: R2.2@-80.16,1774.63 v1(-36,1774.63) ; R4.2@-80.16,1942.52 v1(-36,1942.52)
  other v1: 108.96,1359.85 132.96,1359.85 156.96,1359.85 180.96,1359.85 108.96,1385.85 132.96,1385.85 156.96,1385.85 180.96,1385.85 108.96,1411.85 132.96,1411.85 156.96,1411.85 180.96,1411.85
VBUS: C12.2 D6.1 F1.1 Q1.2
VDD: C16.2 C17.2 C18.2 C22.2 C23.2 FB1.1 J7.1 R27.2 R31.2 R32.2 R33.2 R45.2 U3.11 U3.37 U3.44 | length 307.2
  Top Layer w7: v1(974.7,1321.89) U3.37@999.05,1321.89
  Top Layer w10: R31.2@939,1203.49 938.73,1203.22 v1(938.73,1189.08) ccw(c950.75,1201.1) 950.75,1184.09 U3.44@999.05,1184.09 ; v1(1218.54,1053.04) U3.11@1218.54,1082.72
  Top Layer w15: R33.2@1012.69,1571.12 R32.2@1059.67,1571.12 1059.67,1595.98 1059.51,1596.14 v1(1059.51,1596.34)
  Top Layer w20: J7.1@1094.45,1863.72 1094.45,1939.53 v1(1094.59,1939.67)
  Bottom Layer w7: C23.2@1001.87,1321.89 ccw(c1001.87,1322.89) C23.2@1002.87,1322.89
  Bottom Layer w15: v1(974.7,1321.89) C23.2@1001.87,1321.89
VDDPA: R34.2 U3.25 | length 61.5
  Top Layer w15: U3.25@1239.82,1344.53 1276.37,1344.53 v1(1276.41,1344.57)
  Bottom Layer w10: R34.2@1255.54,1337.53 cw(c1262.58,1337.53) 1262.58,1344.57 v1(1276.41,1344.57)
VDDRF: C27.2 C28.2 C40.2 R28.2 R34.1 U3.28 U3.46 | length 577
  Top Layer w7: v1@959.7,1144.63 998.95,1144.63 U3.46@999.05,1144.72
  Top Layer w10: U3.28@1179.17,1344.53 1178.98,1344.53 1178.98,1374 v1(1179.35,1374)
  Power w10: v1(959.7,1144.53) 1136.21,1144.53 ccw(c1136.21,1187.68) 1179.35,1187.68 v1(1179.35,1374)
  Bottom Layer w7: R34.1@1218.54,1340.53 cw(c1218.54,1337.53) R34.1@1221.54,1337.53
  Bottom Layer w10: v1(1179.35,1374) cw(c1179.35,1373.19) 1180.17,1373.19 C40.2@1180.17,1340.53
  Bottom Layer w15: C40.2@1180.17,1340.53 R34.1@1218.54,1340.53
VDDRF1V55: C29.2 L2.1 U3.29 U3.45 | length 747
  Top Layer w7: C29.2@1150.48,1420.12 cw(c1150.48,1411.12) 1159.48,1411.12 v1(1159.48,1394.15)
  Top Layer w10: v1(927.41,1164.41) U3.45@999.05,1164.41 ; U3.29@1159.48,1344.53 v1(1159.48,1394.15)
  Top Layer w15: v1(828.12,1150) 828.12,1126.23 L2.1@840.93,1113.41
  Power w10: v1(828.12,1150) cw(c863.81,1114.3) 863.81,1164.79 1131.74,1164.79 ccw(c1131.74,1192.53) 1159.48,1192.53 v1(1159.48,1394.15)
VIN: C6.2 SW1.2 U2.10 U2.11
VUSB: D1.4 D1.5 D1.6 J1.A9 J1.B9 Q1.3
pads on no net: ANT1.2 J4.2@1227.52,-100.43 J4.3 J7.7 J7.8 SW1.1 U2.14 U3.2 U3.3 U3.6 U3.7 U3.9 U3.10 U3.12 U3.14 U3.15 U3.16 U3.17 U3.22 U3.31 U3.32 U3.33 U3.38 U3.43 U6.3 U6.4

## Polygon pours and split planes (outlines as drawn)
GND on Top Layer "NONET_L-01_P-001" (solid, remove dead copper, pour order 13): -157.48,-57.48 -157.48,2282.6 1811.03,2282.6 1811.03,-57.48 cw(c1711.03,-57.48) 1711.03,-157.48 -57.48,-157.48 cw(c-57.48,-57.48)
NetD4_2 on Top Layer "NONET_L-01_P-001" (solid, pour order 1): 610.32,-142.31 738.12,-142.31 ccw(c738.12,-100.43) 780,-100.43 780,101.26 590,101.26 441.26,101.26 ccw(c441.26,60) 400,60 400,-20.52 400,-101.67 ccw(c440.64,-101.67) 440.64,-142.31
NetD5_2 on Top Layer "NONET_L-01_P-001" (solid, pour order 0): 940,223.5 1066.5,223.5 cw(c1066.5,190) 1100,190 1100,-105 cw(c1062.69,-105) 1062.69,-142.31 839.89,-142.31 cw(c839.89,-107.42) 805,-107.42 805,101.26 940,101.26
GND on Ground "NONET_L-01_P-001" (solid, pour order 4): -157.48,-57.48 -157.48,2282.6 1811.03,2282.6 1811.03,-57.48 cw(c1711.03,-57.48) 1711.03,-157.48 -57.48,-157.48 cw(c-57.48,-57.48)
3V3 on Power "NONET_L-01_P-001" (solid, pour order 7): 1811.03,516 1282,516 1282,1818.03 1811.03,1818.03 1811.03,2282.6 -157.48,2282.6 -157.48,1995.68 399.33,1995.68 399.33,218 -157.48,218 -157.48,-57.48 ccw(c-57.48,-57.48) -57.48,-157.48 1711.03,-157.48 ccw(c1711.03,-57.48) 1811.03,-57.48
VBAT on Power "NONET_L-01_P-001" (solid, pour order 6): -157.48,1975.47 381,1975.47 381,236 -154.55,236 cw(c-154.55,238.93) -157.48,238.93 -157.48,2020.39
GND on Bottom Layer "NONET_L-01_P-001" (solid, remove dead copper, pour order 14): -157.48,-57.48 -157.48,2282.6 1811.03,2282.6 1811.03,-57.48 cw(c1711.03,-57.48) 1711.03,-157.48 -57.48,-157.48 cw(c-57.48,-57.48)

## Other copper
Top Layer:
  rectangle net GND: 1538.73,1286.68 1683.4,1349.22
  rectangle net GND: 1339.44,1139.85 1683.4,1247.08
  region net GND: 1758.67,1428.29 1728.01,1428.29 1728.01,1153 1758.67,1153
  rectangle net GND: 1652.75,1294.27 1683.4,1428.29
  rectangle net NetC39_1: 1250.03,1256.93 1286,1268.74
  region net NetC32_2: 1524.38,1325.92 1503.88,1325.92 1503.88,1302.3 1524.38,1302.3
  rectangle net NetC32_1: 1471.57,1302.3 1492.07,1325.92
  rectangle net GND: 959.7,1099.45 1009.87,1111.26
  rectangle net NetC11_2: 295.15,421.02 367.35,434.94
  region net GND: 232.15,452.3 184.91,452.3 184.91,442.85 232.15,442.85
  rectangle net GND: 271.52,442.85 318.77,452.3
  region net GND: 361.8,916.69 ccw(c394.61,916.69) 394.61,883.88 434.97,883.88 434.97,874.52 cw(c430.56,874.52) 430.56,870.11 365.4,870.11 cw(c365.4,873.7) 361.8,873.7
  region net VBUS: 255.24,1142.57 ccw(c255.24,1125.01) 237.68,1125.01 237.68,1000.28 ccw(c252.43,1000.28) 252.43,985.53 283.31,985.53 ccw(c283.31,999.9) 297.68,999.9 297.68,1059.6 cw(c309.73,1059.6) 309.73,1071.65 462.19,1071.65 ccw(c462.19,1096.98) 487.51,1096.98 487.51,1195.57 cw(c508.79,1195.57) 508.79,1216.85 549.85,1216.85 ccw(c549.85,1235) 568,1235 568,1318 ccw(c541.54,1318) 541.53,1344.46 367.58,1344.46 ccw(c367.58,1321.96) 345.07,1321.96 345.07,1164.61 cw(c323.03,1164.61) 323.03,1142.57
  region net VUSB: -53.9,1089 ccw(c-53.9,1075.19) -67.71,1075.19 -67.71,940.09 ccw(c-51.94,940.09) -51.93,924.32 316.22,924.32 316.22,964.13 11.87,964.13 cw(c11.87,976.87) -0.87,976.87 -0.87,1036.12 cw(c11.56,1036.12) 11.56,1048.55 93.34,1048.55 93.34,1089
  region net NetC5_2: 37,1156.92 cw(c37,1176.6) 17.32,1176.6 17.32,1267.32 cw(c32,1267.32) 32,1282 180.7,1282 cw(c180.7,1265.02) 197.68,1265.02 197.68,1169.3 cw(c184.36,1169.3) 184.36,1155.99 37.93,1155.99 cw(c37.93,1156.92)
  region net NetC3_2: 600.16,1374.58 747.58,1374.58 ccw(c747.58,1413) 786,1413 786,1493.93 786,1578 ccw(c750.72,1578) 750.72,1613.28 652.86,1613.28 519.72,1613.28 cw(c519.71,1623.18) 509.82,1623.18 509.82,1638.65 484.82,1638.65 484.82,1623.8 cw(c474.29,1623.8) 474.29,1613.28 351.5,1613.28 351.5,1543.49 461.37,1543.49 cw(c461.5,1527.68) 477.31,1527.8 477.32,1437.57 cw(c459.6,1437.57) 459.6,1419.86 414.32,1419.86 414.32,1374.58
  region net VBAT: 302.29,1613.28 302.29,1351.29 cw(c277,1351.29) 277,1326 61,1326 cw(c61,1349.99) 37,1350 37,1477 cw(c63,1477) 63,1503 214.84,1503 ccw(c214.84,1522.52) 234.37,1522.52 234.37,1613.28
  region net VIN: -67.69,524.96 ccw(c-67.69,497.4) -95.25,497.4 ccw(c-67.69,497.4) -67.69,469.85 151.52,469.85 151.52,524.96
  region net NetL1_2: 295.15,521.59 295.15,571.5 ccw(c283.44,571.5) 283.44,583.2 262.68,583.2 262.68,684.27 cw(c273.41,684.27) 273.41,695 306.92,695 cw(c306.93,683.16) 318.77,683.15 318.77,521.59
  region net NetL1_1: 208.53,526.31 208.53,571.5 cw(c220.24,571.5) 220.24,583.2 241,583.2 241,684.27 ccw(c230.27,684.27) 230.27,695 196.76,695 ccw(c196.75,683.16) 184.91,683.15 184.91,526.31
  region net DC-IN: 663.1,221 663.1,169.9 ccw(c708.87,169.9) 708.87,124.13 913.48,124.13 913.48,381.13 814.2,381.13 cw(c814.97,410.1) 786,410.88 786,1150 ccw(c760.03,1150) 760.02,1175.98 535.43,1175.98 ccw(c535.43,1147.55) 507,1147.55 507,1019.66 cw(c479.54,1019.66) 479.54,992.2 395.74,992.2 ccw(c395.74,973.46) 377,973.46 377,917.61 ccw(c395.52,917.6) 395.53,899.08 636.92,899.08 cw(c636.92,872.9) 663.1,872.9
  region net GND: 999.05,1103.39 999.05,1111.26 1024.87,1111.26 1024.87,1103.39
  region net PG: 273.15,1661.71 273.15,1692.02 302.29,1692.02 302.29,1661.71
  region net NetC3_2: 484.82,1638.65 509.82,1638.65 509.82,1588 484.82,1588
  region net NetNTC1_2: 380.63,1681.39 351.5,1681.39 351.5,1784.52 380.63,1784.52
  region net NetNTC1_2: 380.63,1793.24 380.63,1750.81 297.76,1750.81 297.76,1793.24
  region net GND: 380.63,1656.54 326.89,1656.54 326.89,1638.04 380.63,1638.04 380.63,1647.34
  region net VIN: 208.53,516.57 208.53,477.06 -67.69,477.06 -67.69,516.57
  region net 3V3: 509.54,513.78 509.54,381.89 401.75,381.89 401.75,460.21 295.15,460.21 295.15,513.78
Power:
  region net VDD: 65 vertices and 7 holes, not listed, extent 834.5,1180.06 1161,2017.25
Bottom Layer:
  region net VDDRF: 1011.87,978.1 1011.87,1162.61 945.36,1162.61 945.36,1124.66 964.8,1124.66 cw(c964.8,1111.74) 977.72,1111.74 977.72,1085.5 977.72,1046.34 cw(c965.86,1046.34) 965.86,1034.48 943.68,1034.48 ccw(c943.68,1022.71) 931.91,1022.71 931.91,991.15 ccw(c944.96,991.15) 944.96,978.1
  region net VDD: 926.21,1180.84 1089.54,1180.84 cw(c1089.54,1172.11) 1098.27,1172.11 1098.27,1133.23 1098.27,1089.19 ccw(c1112.72,1089.19) 1112.72,1074.75 1182.78,1074.75 1182.78,978.1 1244.24,978.1 1244.24,1102.48 1168.29,1102.48 cw(c1168.29,1112.93) 1157.84,1112.93 1157.84,1134.29 cw(c1169.5,1134.29) 1169.5,1145.96 1229.19,1145.96 1229.19,1171 1137.77,1171 cw(c1137.77,1180.84) 1127.94,1180.84 1127.94,1204.35 ccw(c1111.86,1204.36) 1111.85,1220.44 977.72,1220.44 cw(c965.15,1220.44) 965.15,1207.87 926.21,1207.87
  region net 3V3: 1049.37,978.1 1174.95,978.1 1174.95,1066.75 1049.37,1066.75
Multi-Layer:
  pour cut-out: 1377.96,919.55 1811.03,919.55 1811.03,545.53 1377.96,545.53
  pour cut-out: 1590,1724.83 1811.96,1724.83 1811.96,1508.29 1590,1508.29

## Silkscreen, mask and mechanical layers (free items; w line width, h text height)
Top Overlay:
  lines w5: 115.04,1049.21 115.04,957.69 219.12,957.69 ; 219.12,935.79 219.12,957.69 ; 219.12,1049.21 219.12,957.69 ; 969.85,989.16 1006.36,989.16 ; 1193,1485 993.76,1485 993.76,1394.15 1362.91,1394.15 ; 1294,1204 1344.8,1204 1344.8,1237.05 1409.5,1237.05 1409.5,1204 1469.97,1204 1469.97,1237.27 1528.97,1237.27 1528.97,1206.93 1598.4,1206.93 1598.4,1236.43 1728.84,1236.43 1728.84,1338.45 1626.8,1338.45 1626.8,1307.37 1548.08,1307.37 1548.08,1349.22 ; 1295.79,1293.11 1329.91,1293.11 1329.91,1332.11 1303.95,1332.11 1303.95,1382.7 ; 1403.53,1950 1503.69,1950 1503.69,2048.11 ; 1475.33,1382.45 1475.33,1360 1548.08,1360 1548.08,1338.45 ; 1503.69,1999.05 1655.17,1999.05 1655.17,1963.67 ; 425.81,1834.49 846.81,1834.49 846.81,1940.49 425.81,1940.49 425.81,1834.49 ; 655,454.03 1200,454.03 1200,605 655,605 655,454.03 ; 719.72,938.53 969.31,938.53 969.31,1040.37 719.72,1040.37 719.72,938.53 ; 1006.36,944.32 1255.05,944.32 1255.05,1034 1006.36,1034 1006.36,944.32
  text "1" at 396.73,1903.71 h50
  text "49" at 1672.75,1814.36 h30 r90
  text "BATTERY" at -99.67,1690.97 h60
  text "1" at 960.74,1449.17 h50
  text "+" at 181.68,1397.34 h70
  text "2" at 1366.11,1189.11 h50
  text "2" at 1163.44,620.33 h50
  text "DC INPUT" at 1018.94,275.62 h60
  text "SOLAR" at 421.16,261.57 h60
  text "+" at 603.8,9.14 h100
  text "DC 4.5V-18V" at 640,-142.31 h60
Bottom Overlay:
  lines w5: 974.7,1151.11 1013.95,1151.11
  text "End-Device-v1.0" at 990,-120.07 h50
Board Outline:
  the board outline again, w5
Fabrication:
  drawing of 295 lines, arcs and shapes, not listed
  text "Layer" at 2710.34,2385 h60
  text "Name" at 3120.26,2385 h60
  text "Material" at 4050,2385 h60
  text "Thickness" at 4909.77,2385 h60
  text "Constant" at 5559.6,2385 h60
  text "Board Layer Stack" at 6129.46,2385 h60
  text "Top Overlay" at 3120.26,2265 h60
  text "Top Solder" at 3120.26,2145 h60
  text "Solder Resist" at 4050,2145 h60
  text "0.012mm" at 4909.77,2145 h60
  text "3.5" at 5559.6,2145 h60
  text "1" at 2710.34,2025 h60
  text "Top Layer" at 3120.26,2025 h60
  text "0.035mm" at 4909.77,2025 h60
  text "Dielectric 2" at 3120.26,1905 h60
  text "PP-006" at 4050,1905 h60
  text "0.203mm" at 4909.77,1905 h60
  text "4.4" at 5559.6,1905 h60
  text "2" at 2710.34,1785 h60
  text "Ground" at 3120.26,1785 h60
  text "CF-004" at 4050,1785 h60
  text "0.030mm" at 4909.77,1785 h60
  text "Dielectric 1" at 3120.26,1665 h60
  text "FR-4" at 4050,1665 h60
  text "1.030mm" at 4909.77,1665 h60
  text "4.6" at 5559.6,1665 h60
  text "3" at 2710.34,1545 h60
  text "Power" at 3120.26,1545 h60
  text "CF-004" at 4050,1545 h60
  text "0.030mm" at 4909.77,1545 h60
  text "Dielectric 3" at 3120.26,1425 h60
  text "PP-006" at 4050,1425 h60
  text "0.203mm" at 4909.77,1425 h60
  text "4.4" at 5559.6,1425 h60
  text "4" at 2710.34,1305 h60
  text "Bottom Layer" at 3120.26,1305 h60
  text "0.035mm" at 4909.77,1305 h60
  text "Bottom Solder" at 3120.26,1185 h60
  text "Solder Resist" at 4050,1185 h60
  text "0.012mm" at 4909.77,1185 h60
  text "3.5" at 5559.6,1185 h60
  text "Bottom Overlay" at 3120.26,1065 h60
  text "Total board thickness:" at 2710.34,945 h60
  text "1.589mm" at 4909.77,945 h60
Drill Drawing:
  circle w10: c-103.13,3948.33 r33.33
  circle w10: c-103.13,3198.33 r20
  circle w10: c-103.13,3198.33 r33.33
  lines w10: -136.47,3331.67 -119.8,3331.67 -119.8,3315 -86.47,3315 -86.47,3331.67 -69.8,3331.67 -69.8,3365 -86.47,3365 -86.47,3381.67 -119.8,3381.67 -119.8,3365 -136.47,3365 -136.47,3331.67 ; -136.47,3481.67 -119.8,3481.67 -103.13,3465 -86.47,3481.67 -69.8,3481.67 -86.47,3498.33 -69.8,3515 -86.47,3515 -103.13,3531.67 -119.8,3515 -136.47,3515 -119.8,3498.33 -136.47,3481.67 ; -136.47,3615 -103.13,3631.67 -69.8,3615 -86.47,3648.33 -69.8,3681.67 -103.13,3665 -136.47,3681.67 -119.8,3648.33 -136.47,3615 ; -136.47,3798.33 -103.13,3765 -69.8,3798.33 -103.13,3831.67 -136.47,3798.33 ; -136.47,4065 -136.47,4081.67 -119.8,4098.33 -136.47,4115 -136.47,4131.67 -119.8,4131.67 -103.13,4115 -86.47,4131.67 -69.8,4131.67 -69.8,4115 -86.47,4098.33 -69.8,4081.67 -69.8,4065 -86.47,4065 -103.13,4081.67 -119.8,4065 -136.47,4065 ; -136.47,4215 -69.8,4215 -69.8,4281.67 -136.47,4281.67 -136.47,4215 ; -136.47,4431.67 -69.8,4431.67 -103.13,4365 -136.47,4431.67 ; -136.47,4515 -69.8,4515 -69.8,4581.67 -136.47,4581.67 -136.47,4515 ; -123.13,4528.33 -83.13,4528.33 -83.13,4568.33 -123.13,4568.33 -123.13,4528.33
  lines w15: -196.26,3120 6933.8,3120 ; -196.26,4620 6933.8,4620 ; 354.62,2970 354.62,4770 ; 944.46,2970 944.46,4770 ; 2084.13,2970 2084.13,4770 ; 2590,2970 2590,4770 ; 3323.81,2970 3323.81,4770 ; 4823.36,2970 4823.36,4770 ; 5413.2,2970 5413.2,4770 ; 6159,2970 6159,4770 ; -196.26,2970 6933.8,2970 6933.8,4770 -196.26,4770 -196.26,2970
  text "Symbol" at -106.26,4665 h72
  text "Count" at 399.62,4665 h72
  text "Hole Size" at 989.46,4665 h72
  text "Plated" at 2129.13,4665 h72
  text "Hole Type" at 2635,4665 h72
  text "Drill Layer Pair" at 3368.81,4665 h72
  text "Via/Pad" at 4868.36,4665 h72
  text "Pad Shape" at 5458.2,4665 h72
  text "Template" at 6204,4665 h72
  text "730" at 399.62,4515 h60
  text "7.87mil (0.200mm)" at 989.46,4515 h60
  text "PTH" at 2129.13,4515 h60
  text "Round" at 2635,4515 h60
  text "Top Layer - Bottom Layer" at 3368.81,4515 h60
  text "(Mixed)" at 4868.36,4515 h60
  text "Rounded" at 5458.2,4515 h60
  text "(Mixed)" at 6204,4515 h60
  text "4" at 399.62,4365 h60
  text "20.47mil (0.520mm)" at 989.46,4365 h60
  text "PTH" at 2129.13,4365 h60
  text "Slot" at 2635,4365 h60
  text "Top Layer - Bottom Layer" at 3368.81,4365 h60
  text "Pad" at 4868.36,4365 h60
  text "Rounded" at 5458.2,4365 h60
  text "(Mixed)" at 6204,4365 h60
  text "4" at 399.62,4215 h60
  text "31.50mil (0.800mm)" at 989.46,4215 h60
  text "PTH" at 2129.13,4215 h60
  text "Round" at 2635,4215 h60
  text "Top Layer - Bottom Layer" at 3368.81,4215 h60
  text "Pad" at 4868.36,4215 h60
  text "(Mixed)" at 5458.2,4215 h60
  text "(Mixed)" at 6204,4215 h60
  text "8" at 399.62,4065 h60
  text "35.43mil (0.900mm)" at 989.46,4065 h60
  text "PTH" at 2129.13,4065 h60
  text "Round" at 2635,4065 h60
  text "Top Layer - Bottom Layer" at 3368.81,4065 h60
  text "Pad" at 4868.36,4065 h60
  text "(Mixed)" at 5458.2,4065 h60
  text "(Mixed)" at 6204,4065 h60
  text "4" at 399.62,3915 h60
  text "36.00mil (0.914mm)" at 989.46,3915 h60
  text "PTH" at 2129.13,3915 h60
  text "Round" at 2635,3915 h60
  text "Top Layer - Bottom Layer" at 3368.81,3915 h60
  text "Pad" at 4868.36,3915 h60
  text "Rounded" at 5458.2,3915 h60
  text "c152h91o0_0" at 6204,3915 h60
  text "2" at 399.62,3765 h60
  text "47.24mil (1.200mm)" at 989.46,3765 h60
  text "PTH" at 2129.13,3765 h60
  text "Round" at 2635,3765 h60
  text "Top Layer - Bottom Layer" at 3368.81,3765 h60
  text "Pad" at 4868.36,3765 h60
  text "Rounded" at 5458.2,3765 h60
  text "c230h120" at 6204,3765 h60
  text "1" at 399.62,3615 h60
  text "62.99mil (1.600mm)" at 989.46,3615 h60
  text "NPTH" at 2129.13,3615 h60
  text "Round" at 2635,3615 h60
  text "Top Layer - Bottom Layer" at 3368.81,3615 h60
  text "Pad" at 4868.36,3615 h60
  text "Rounded" at 5458.2,3615 h60
  text "c0hn160m10" at 6204,3615 h60
  text "3" at 399.62,3465 h60
  text "62.99mil (1.600mm)" at 989.46,3465 h60
  text "PTH" at 2129.13,3465 h60
  text "Round" at 2635,3465 h60
  text "Top Layer - Bottom Layer" at 3368.81,3465 h60
  text "Pad" at 4868.36,3465 h60
  text "Rounded" at 5458.2,3465 h60
  text "(Mixed)" at 6204,3465 h60
  text "1" at 399.62,3315 h60
  text "70.87mil (1.800mm)" at 989.46,3315 h60
  text "NPTH" at 2129.13,3315 h60
  text "Round" at 2635,3315 h60
  text "Top Layer - Bottom Layer" at 3368.81,3315 h60
  text "Pad" at 4868.36,3315 h60
  text "Rounded" at 5458.2,3315 h60
  text "c0hn180m10" at 6204,3315 h60
  text "4" at 399.62,3165 h60
  text "122.05mil (3.100mm)" at 989.46,3165 h60
  text "PTH" at 2129.13,3165 h60
  text "Round" at 2635,3165 h60
  text "Top Layer - Bottom Layer" at 3368.81,3165 h60
  text "Pad" at 4868.36,3165 h60
  text "Rounded" at 5458.2,3165 h60
  text "c500h310" at 6204,3165 h60
  text "761 Total" at 399.62,3015 h60
  text "Slot definitions :" at -106.26,2870.03 h60
  text "Routed Path Length" at 926.43,2870.03 h60
  text "= Calculated from tool start centre position to tool end centre position." at 2029.1,2870.03 h60
  text "Hole Length" at 926.43,2770.05 h60
  text "= Routed Path Length + Tool Size = Slot length as defined in the PCB layout" at 1619.23,2770.05 h60

## Dimensions
-157.48,2182.6 to 1811.03,2182.6 on Dimension
-157.48,-57.48 to -57.48,2282.6 on Dimension